# Altium PCB Custom_Keyboard.PcbDoc (part 3 of 3)
Units mil, origin at the board's own origin, x right, y up, seen from the top; angles counter-clockwise.
Board outline 3302 x 1991 mil, 2 copper layers (Top Layer, Bottom Layer), stack 57 mil thick; 188 components, 152 nets, 718 pads, 297 vias.
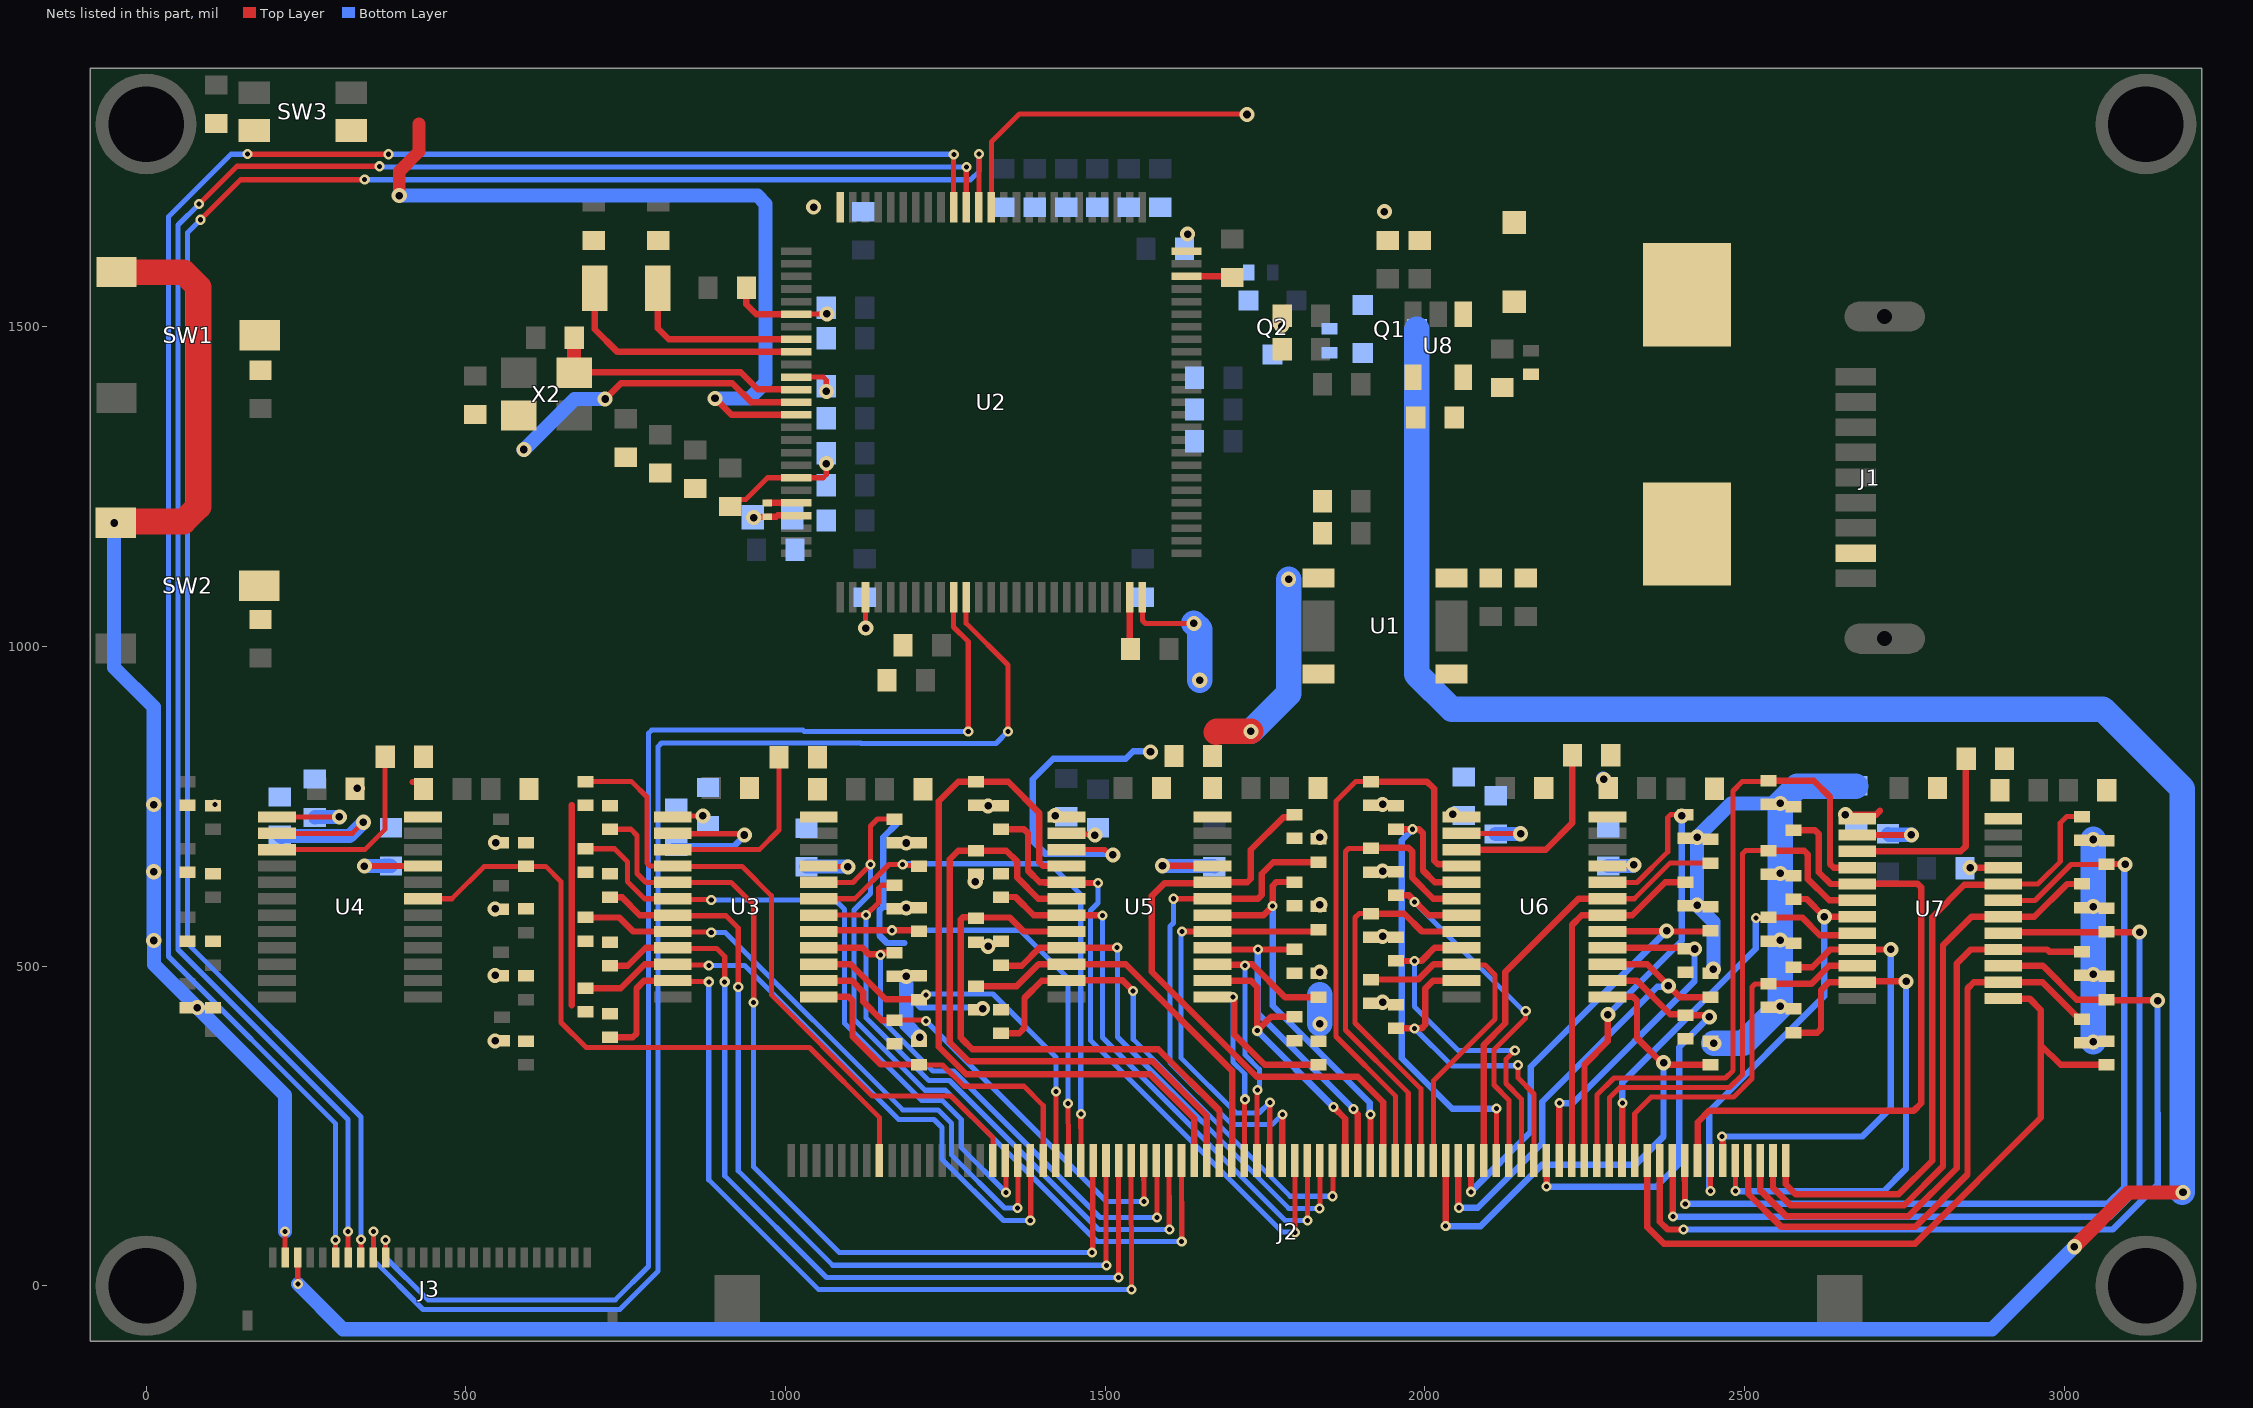
[diagram p2: the nets of this part, all layers, seen from the top]

## Via types
v1: diameter 15.75, hole 7.87, Top Layer to Bottom Layer, tented both sides, 170 vias
v2: diameter 23.62, hole 11.81, Top Layer to Bottom Layer, tented both sides, 127 vias

## Nets (pads, with @x,y where several pads share a name; then routed paths per layer and width w, separated by ;. In a path a pad name is that pad's centre, name@x,y a point inside that pad or via, vN(x,y) a via of type N, cw(c..) or ccw(c..) an arc to the next point about the centre after c; other vN are vias at no path point) (continued)
MUX_1.SDA_8: J2.8 R57.1 U4.19 | length 1049.2
  Top Layer w8: U4.19@453.17,605.3 478.3,605.3 528.5,655.5 R57.1@594,655.5 ; R57.1@594,656 625,656 649,632 649,411.94 688.44,372.5 1037.71,372.5 1147.44,262.77 J2.8@1147.44,220.44
MUX_2.SCL_9: J2.25 R60.1 U3.5 | length 1450
  Top Layer w8: R60.1@724,714 758.31,714 768,704.31 768,644.93 782.05,630.89 U3.5@816,630.89 ; U3.5@816.56,631.44 817.11,630.89 U3.5@823.83,630.89 823.94,631 915,631 950.52,595.48 950.52,443.52 v1(950.15,443.15) ; v1(1479.54,51.87) 1480.63,52.97 1480.63,194.92 J2.25@1481.72,196.01
  Bottom Layer w8: v1(950.15,443.15) 950.03,443.03 950.03,185.97 1084.13,51.87 v1(1479.54,51.87)
MUX_2.SCL_10: J2.26 R62.1 U3.7 | length 1400.4
  Top Layer w8: U3.7@824.77,578.76 907.24,578.76 926.23,559.77 v1(926.23,467.08) ; J2.26@1501.41,196.01 1501.7,195.71 1501.7,31.92 v1(1502,31.62)
  Top Layer w10: R62.1@726,607.5 744.5,607.5 772.3,579.7 U3.7@823.83,579.7
  Bottom Layer w8: v1(926.23,467.08) 926.23,179.77 1074,32 1501.62,32 v1(1502,31.62)
MUX_2.SCL_11: J2.27 R64.1 U3.9 | length 1403
  Top Layer w8: U3.9@824.95,527.76 892.24,527.76 905.08,514.92 v1(905.08,475.46) ; v1(1521,12.75) 1521.05,12.8 1521.05,195.96 J2.27@1521.09,196.01
  Top Layer w10: R64.1@726,500.5 753.5,500.5 781.52,528.52 U3.9@823.83,528.52
  Bottom Layer w8: v1(905.08,475.46) 905.08,171.92 1064.25,12.75 v1(1521,12.75)
MUX_2.SCL_12: J2.28 R66.1 U3.11 | length 1477.1
  Top Layer w8: U3.11@823.83,477.34 825.17,476 879.58,476 v1(880.13,475.46) ; J2.28@1540.78,196.01 v1(1541.14,-6.13)
  Top Layer w10: R66.1@726,388.5 761.14,388.5 767,394.36 767,465 779.34,477.34 U3.11@823.83,477.34
  Bottom Layer w8: v1(880.13,475.46) 880.13,165.87 1052.13,-6.13 v1(1541.14,-6.13)
MUX_2.SCL_13: J2.29 R68.1 U3.14 | length 724.9
  Top Layer w8: R68.1@1171,415.5 1218.5,415.5 1219.93,414.07 v1(1220.07,414.07) ; J2.29@1560.46,196.01 v1(1561,131.71)
  Top Layer w10: U3.14@1052.17,477.34 1103.62,477.34 1121.93,459.03 1121.93,444.5 1150.93,415.5 R68.1@1171,415.5
  Bottom Layer w8: v1(1220.07,414.07) 1220.07,413.93 1502.29,131.71 v1(1561,131.71)
MUX_2.SCL_14: J2.30 R70.1 U3.16 | length 873.1
  Top Layer w8: v1(1581,106.87) J2.30@1581,196.01
  Top Layer w10: U3.16@1052.17,528.52 1120.48,528.52 1130.77,518.23 1147.65,518.23 v1(1148.75,517.13) ; v1@1148.75,521 R70.1@1171,521
  Bottom Layer w8: v1(1148.75,517.13) 1148.75,417.68 1230.55,335.87 1262.88,335.87 1491.89,106.87 v1(1581,106.87)
MUX_2.SCL_15: J2.31 R72.1 U3.18 | length 1031.6
  Top Layer w8: U3.18@1052.17,579.7 v1(1126.13,579.7) 1146,599.58 1146,621.81 1150.69,626.5 R72.1@1171,626.5 ; J2.31@1599.83,196.01 1600.4,88.19 v1(1600.6,87.99)
  Bottom Layer w8: v1(1126.13,579.7) 1126.13,419.09 1224.34,320.87 1256.67,320.87 1489.55,87.99 v1(1600.6,87.99)
MUX_2.SCL_16: J2.32 R74.1 U3.20 | length 1231.6
  Top Layer w8: U3.20@1052.17,630.89 1105.67,630.89 1112.79,638 1112.86,638 1132.78,657.91 v1(1132.78,659.02) ; v1@1133.45,659.7 1133.13,660.02 1133.13,719.28 1143.84,730 R74.1@1171,730 ; J2.32@1619.52,196.01 v1(1619.88,69.12)
  Bottom Layer w8: v1(1132.78,659.02) 1133.19,658.61 1133.19,613.47 1107.25,587.52 1107.25,416.75 1218.13,305.87 1250.46,305.87 1487.21,69.12 v1(1619.88,69.12)
MUX_2.SDA_9: J2.17 R59.1 U3.4 | length 1033.6
  Top Layer w8: R59.1@684,788.5 759.5,788.5 783.69,764.32 783.69,661.06 788.37,656.38 U3.4@803.16,656.42 ; U3.4@823.83,656.48 824.3,656 932,656 978,610 978,455 1136,297 1259,297 1324.61,231.39 J2.17@1324.61,220.44
  Top Layer w10: U3.4@803.16,656.48 U3.4@823.83,656.48
MUX_2.SDA_10: J2.18 R61.1 U3.6 | length 1080.8
  Top Layer w8: R61.1@684,683.5 732.56,683.5 753,663.06 753,632 779.7,605.3 U3.6@823.83,605.3 ; U3.6@824.77,604.35 883.06,604.35 v1(884,603.41) ; J2.18@1343.93,196.01 1344.99,174.47 v1(1345,146)
  Bottom Layer w8: v1(884,603.41) 1077.59,603.41 1092.25,588.75 1092.25,410.53 1212.65,290.13 1244.99,290.13 1275.06,260.06 1275.06,215.94 v1(1345,146)
MUX_2.SDA_11: J2.19 R63.1 U3.8 | length 966.6
  Top Layer w8: U3.8@824.77,553.17 883.06,553.17 v1(884,552.23) ; v1(1363.11,121.77) 1363.98,122.63 J2.19@1363.98,196.01
  Top Layer w10: R63.1@687,576 740,576 761.89,554.11 U3.8@823.83,554.11
  Bottom Layer w8: v1(884,552.23) 906.32,552.23 1183.41,275.13 1238.77,275.13 1260.06,253.85 1260.06,204.25 1342.54,121.77 v1(1363.11,121.77)
MUX_2.SDA_12: J2.20 R65.1 U3.10 | length 999.3
  Top Layer w8: U3.10@824.77,501.99 879.18,501.99 v1(880.13,501.05) ; v1@1383.66,101.94 J2.20@1383.66,196.01
  Top Layer w10: R65.1@687,465.5 742.54,465.5 779.97,502.93 U3.10@823.83,502.93
  Bottom Layer w8: v1(880.13,501.05) 936.28,501.05 1177.2,260.13 1232.56,260.13 1245.06,247.64 1245.06,198.04 1341.15,101.94 v1(1382.94,101.94)
MUX_2.SDA_13: J2.21 R67.1 U3.13 | length 515.5
  Top Layer w8: R67.1@1209,345.43 1245.86,345.43 1279.29,312 1373,312 1403.35,281.65 J2.21@1403.35,220.44
  Top Layer w10: U3.13@1052.17,451.75 1099.07,451.75 1104.93,445.89 1104.93,390.07 1149,346 1208.43,346 R67.1@1209,345.43
MUX_2.SDA_14: J2.22 R69.1 U3.15 | length 561.1
  Top Layer w8: J2.22@1423.03,220.44 v1@1423.03,303.76
  Top Layer w10: U3.15@1052.17,502.93 1102.07,502.93 1157,448 1208.5,448 R69.1@1209,447.5
  Bottom Layer w8: v1(1220.13,455.13) 1221.2,456.2 1324.56,456.2 1423.22,357.54 v1(1423.22,303.94)
MUX_2.SDA_15: J2.23 R71.1 U3.17 | length 723.2
  Top Layer w8: v1(1442.12,285.29) J2.23@1442.72,220.44
  Top Layer w10: U3.17@1054.17,554.11 1056.06,556 v1(1167,556) 1206.73,556 1208.61,554.11 R71.1@1209,554.5
  Bottom Layer w8: v1(1167,556) 1367,556 1442.12,480.88 v1(1442.12,285.29)
MUX_2.SDA_16: J2.24 R73.1 U3.19 | length 843.9
  Top Layer w8: U3.19@1072.17,605.3 1108.27,605.3 1161.85,658.87 v1(1183.48,658.87) 1184.92,657.44 R73.1@1202.94,657.44 ; v1(1462.03,268.88) J2.24@1462.46,220.5
  Bottom Layer w8: v1(1183.48,658.87) 1184.61,660 1414,660 1462.03,611.97 1462.03,353.41 v1(1462.03,268.88)
MUX_3.SCL_17: J2.41 R76.1 U5.5 | length 1058.9
  Top Layer w8: J2.41@1796.69,196.01 1797,195.69 v1(1797,83.38)
  Top Layer w10: R76.1@1340,714 1373.14,714 1379.5,707.64 1379.5,649.43 1398.05,630.89 U5.5@1439.83,630.89 ; 1406.71,630 v1(1489,630)
  Bottom Layer w8: v1(1489,630) 1489,598.79 1477.03,586.82 1477.03,383.97 1777.13,83.87 1796.5,83.87 v1(1797,83.38)
MUX_3.SCL_18: J2.42 R78.1 U5.7 | length 895.3
  Top Layer w8: U5.7@1439.83,579.7 U5.7@1440.18,579.35 ; J2.42@1816.37,196.01 1816.37,102.72 v1(1816.84,102.25)
  Top Layer w10: R78.1@1337,607.5 1337.5,608 1360,608 1388.3,579.7 U5.7@1439.83,579.7 ; U5.7@1440.18,579.35 1494.52,579.35 1494.87,579 v1(1495.9,579)
  Bottom Layer w8: v1(1495.9,579) 1495.9,388.1 1781.75,102.25 v1(1816.84,102.25)
MUX_3.SCL_19: J2.43 R80.1 U5.9 | length 835.1
  Top Layer w8: U5.9@1439.83,528.52 U5.9@1440.06,528.76 ; J2.43@1836.06,196.01 1836.09,121.74 v1@1836.71,121.13
  Top Layer w10: R80.1@1342,500.5 1369.5,500.5 1397.52,528.52 U5.9@1439.83,528.52 ; U5.9@1440.06,528.76 v1@1517.24,528.76 ; v1@1517,529 v1@1517.24,528.76 ; v1@1519,527 v1@1517.24,528.76 ; v1@1519,528.76 v1@1517.24,528.76
  Bottom Layer w8: v1(1519,529) 1519.01,526.99 1519.43,526.57 1519.43,388.93 1787.23,121.13 v1@1836.71,121.13
  other v1: 1835.71,121.13
MUX_3.SCL_20: J2.44 R82.1 U5.11 | length 819.7
  Top Layer w8: v1@1856.2,140 J2.44@1856.2,196.01
  Top Layer w10: R82.1@1337,395 1365.57,395 1374,403.43 1374,450 1401.16,477.16 1441.42,477.16 1442.04,477.78 1527.22,477.78 v1(1544,461)
  Bottom Layer w8: v1(1544,461) 1544,385.57 1789.57,140 v1@1855,140
  other v1: 1856,140
MUX_3.SCL_21: J2.45 R84.1 U5.14 | length 449.3
  Top Layer w10: U5.14@1668.17,477.34 1727.66,477.34 1738,467 v1(1738,398.89) 1759.61,420.5 R84.1@1796,420.5 ; v1(1857.29,279.6) 1857.29,279.49 1875.69,261.09 J2.45@1875.69,220.54
  Bottom Layer w10: v1@1739.77,394.92 1738,396.69 v1(1738,398.89) v1(1857.29,279.6)
MUX_3.SCL_22: J2.46 R86.1 U5.16 | length 499.2
  Top Layer w10: U5.16@1668.17,528.52 1670.7,526 v1(1739,526) R86.1@1796,526 ; v1(1888.23,276.66) 1888.23,275.11 1895.09,268.24 1895.09,220.82 J2.46@1895.47,220.44
  Bottom Layer w10: v1(1739,526) 1739,426 1888.23,276.77 v1(1888.23,276.66)
MUX_3.SCL_23: J2.47 R88.1 U5.18 | length 585
  Top Layer w10: U5.18@1668.03,579.85 U5.18@1668.17,579.7 ; U5.18@1688.17,579.7 1747.7,579.7 v1(1762,594) 1762,625.64 1767.86,631.5 R88.1@1796,631.5 ; v1(1914.97,268) 1915.06,267.91 1915.06,220.54 J2.47@1915.16,220.44
  Bottom Layer w10: v1(1762,594) 1762,438 1913.87,286.13 1913.87,269.1 v1(1914.97,268)
MUX_3.SCL_24: J2.48 R90.1 U5.20 | length 933.9
  Top Layer w10: R90.1@1796,737 1792,733 1779,733 1728,682 1728,636.74 1722.14,630.89 U5.20@1668.17,630.89 1666.89,629.6 1592.86,629.6 1587,623.74 1573,609.74 1573,491.03 1737.03,327 1895,327 1934.84,287.16 J2.48@1934.84,220.44
MUX_3.SDA_17: J2.33 R75.1 U5.4 | length 1179.8
  Top Layer w10: R75.1@1298,788.5 1270.5,788.5 1240,758 1240,373.92 1282.92,331 1570,331 1634,267 1634.14,267 1639.57,261.58 J2.33@1639.57,220.44 ; R75.1@1300,788.5 1300.37,788.13 1348.34,788.13 1397,739.47 1397,662.33 1401.54,657.79 ; 1402.86,656.48 U5.4@1439.83,656.48
MUX_3.SDA_18: J2.34 R77.1 U5.6 | length 1015.6
  Top Layer w10: U5.6@1439.83,605.3 1395.7,605.3 1362.5,638.5 1362.5,663.5 1345.5,680.5 R77.1@1298,680.5 1270.5,680.5 1257,667 1257,380.96 1286.96,351 1574.18,351 1659.25,265.93 J2.34@1659.25,220.44
MUX_3.SDA_19: J2.35 R79.1 U5.8 | length 862.7
  Top Layer w10: R79.1@1295.71,572.21 R79.1@1298,574.5 ; R79.1@1295.71,576.21 1277.57,576.21 1274.1,572.74 1274,572.5 1274,388 1276.93,385.07 1292,370 1582.96,370 1678.94,274.02 J2.35@1678.94,220.44 ; R79.1@1303,576 1351,576 1372.89,554.11 U5.8@1439.83,554.11
MUX_3.SDA_20: J2.36 R81.1 U5.10 | length 603.1
  Top Layer w10: R81.1@1298,468.5 1361.54,468.5 1395.97,502.93 U5.10@1439.83,502.93 1532.07,502.93 1698.62,336.38 J2.36@1698.62,217.13
MUX_3.SDA_21: J2.37 R83.1 U5.13 | length 483.1
  Top Layer w8: J2.37@1717.87,220.88 1717.87,290.52 v1(1719.02,291.67)
  Top Layer w10: U5.13@1668.17,451.75 1668.33,451.6 v1@1700.25,451.6 ; v1(1700.25,451.45) v1@1700.25,451.6 ; R83.1@1834,345.43 1749.57,345.43 1701.97,393.03 1701.97,451.29 1702.13,451.45 1701.97,451.6 v1@1700.25,451.6
  Bottom Layer w8: v1(1700.25,451.45) 1700.25,349.75 1718.5,331.5 v1@1718.5,291.67
MUX_3.SDA_22: J2.38 R85.1 U5.15 | length 476.9
  Top Layer w8: J2.38@1737.9,220.54 1737.9,302.54 v1@1741.23,305.87
  Top Layer w10: U5.15@1668.17,502.93 1669.14,501.97 1718.16,501.97 v1(1719.13,501) ; v1@1719.13,502.93 1728.07,502.93 ; 1730.07,502.93 1781.5,451.5 R85.1@1834,451.5
  Bottom Layer w8: v1(1719.13,501) 1719.13,451.97 1719.13,360.87 1741.23,338.77 v1@1741.23,305.87
  other v1: 1738.23,305.87
MUX_3.SDA_23: J2.39 R87.1 U5.17 | length 683.8
  Top Layer w8: J2.39@1757.32,196.01 1757.53,196.23 1757.53,286.66 v1(1757.75,286.87)
  Top Layer w10: v1(1620.17,554) 1620.23,554.06 1668.12,554.06 U5.17@1668.17,554.11 ; U5.17@1670.17,554.11 1831.61,554.11 R87.1@1834,556.5
  Bottom Layer w8: v1(1620.17,554) 1620.17,553.17 1619,552 1619,356 1705,270 1740.88,270 v1(1757.75,286.87)
MUX_3.SDA_24: J2.40 R89.1 U5.19 | length 850.7
  Top Layer w8: v1(1606.87,605.3) U5.19@1668.17,605.3
  Top Layer w10: U5.19@1688.17,605.3 1739.14,605.3 1745,611.15 1745,644.33 1763.17,662.5 R89.1@1834,662.5 ; J2.40@1777,196.01 1777.09,196.09 1777.09,267.91 v1(1777.17,268) ; J2.40@1777.27,220.54 v1@1777.27,267.91
  Bottom Layer w8: v1(1606.87,605.3) 1606.87,567.4 1601.3,561.82 1601.3,484.94 1601.5,484.73 1601.5,349.29 1698.79,252 1761.17,252 v1(1777.17,268)
MUX_4.SCL_25: J2.57 R92.1 U6.5 | length 773.8
  Top Layer w8: J2.57@2112.01,220.44 2112.1,220.54 2112.1,276.91 v1(2112.2,277)
  Top Layer w10: R92.1@1955,714 v1(1981,714) 1990.97,714 1997.33,707.64 1997.33,649.43 2015.88,630.89 U6.5@2057.65,630.89
  Bottom Layer w10: v1(1981,714) 1964,697 1964,356 2043,277 v1(2112.2,277)
MUX_4.SCL_26: J2.58 R94.1 U6.7 | length 599.8
  Top Layer w8: J2.58@2131.69,220.44 2131.69,290.31 2108.14,313.86 2108.14,369.14 2157.45,418.45 2157.45,429.45 v1(2158,430)
  Top Layer w10: R94.1@1955,610.5 1975.33,610.5 2006.12,579.7 U6.7@2057.65,579.7
  Bottom Layer w8: v1(1984,600) 2154,430 v1(2158,430)
MUX_4.SCL_27: J2.59 R96.1 U6.9 | length 533.3
  Top Layer w8: v1@2142.81,368.12 v1(2140.81,368.12) 2140.72,368.12 2127.02,354.42 2127.02,316.2 2151.38,291.84 J2.59@2151.38,220.44
  Top Layer w10: R96.1@1955,508 v1(1984,508) 1994.83,508 2015.35,528.52 U6.9@2057.65,528.52
  Bottom Layer w8: v1(1984,508) 1984,436.55 2052.43,368.12 v1(2140.81,368.12)
MUX_4.SCL_28: J2.60 R98.1 U6.11 | length 489.2
  Top Layer w8: v1(2145.89,345.58) 2145.89,325.24 2171.06,300.06 J2.60@2171.06,220.44
  Top Layer w10: R98.1@1955,402.5 v1(1984,402.5) 1994.97,402.5 2000.83,408.36 2000.83,465 2013.17,477.34 U6.11@2057.65,477.34
  Bottom Layer w8: v1(1984,402.5) 2042.5,344 2092.36,344 2092.52,344.16 2144.47,344.16 v1(2145.89,345.58)
MUX_4.SCL_29: J2.61 R100.1 U6.14 | length 693.2
  Top Layer w10: v1(2190.74,155.02) J2.61@2190.75,196.01 ; U6.14@2286,477.34 2331.66,477.34 2384.14,424.86 2406.14,424.86 R100.1@2408,423 ; R100.1@2410,423 2443,423 v2(2445.34,420.66)
  Bottom Layer w10: v1(2190.74,155.02) 2362.02,155.02 2398,191 2398,373.33 v2(2445.34,420.66)
MUX_4.SCL_30: J2.62 R102.1 U6.16 | length 542.9
  Top Layer w10: J2.62@2210.43,220.44 v1(2210.43,285.57) ; U6.16@2286,528.52 2406.48,528.52 2408.12,526.88 2421.88,526.88 v2(2422,526.75)
  Bottom Layer w10: v1(2210.43,285.57) 2231.24,285.57 2422,476.33 v2(2422,526.75)
MUX_4.SCL_31: J2.63 R104.1 U6.18 | length 549.3
  Top Layer w10: J2.63@2230.12,220.44 2230.31,220.63 2230.31,564.36 2245.66,579.7 U6.18@2286,579.7 2324.7,579.7 2376,631 R104.1@2408,631
MUX_4.SCL_32: J2.64 R106.1 U6.20 | length 781
  Top Layer w8: U6.20@2286,630.89 2332.05,630.89 2380,678.84 2380,732.31 2384.69,737 R106.1@2402,737
  Top Layer w10: J2.64@2249.8,220.44 2249.8,345.8 2286.41,382.41 v2(2286.41,424.08) ; v2(2402,735) 2402,731.38 2402.19,731.19 R106.1@2408,737
  Bottom Layer w10: v2(2286.41,424.08) 2402,539.67 v2(2402,735)
MUX_4.SDA_25: J2.49 R91.1 U6.4 | length 906
  Top Layer w8: R91.1@1916,788.5 1891.5,788.5 1861,758 1861,390 1954.53,296.47 J2.49@1954.53,220.44
  Top Layer w10: R91.1@1916,788.5 2003.5,788.5 2014.83,777.17 2014.83,664.96 2020.68,659.11 2055.02,659.11 U6.4@2057.65,656.48
MUX_4.SDA_26: J2.50 R93.1 U6.6 | length 740.4
  Top Layer w8: R93.1@1916,684 1880.69,684 1876,679.31 1876,400 1974.21,301.79 J2.50@1974.21,220.44
  Top Layer w10: R93.1@1916,684 1917,685 1974.47,685 1980.33,679.14 1980.33,638.5 2013.53,605.3 U6.6@2057.65,605.3
MUX_4.SDA_27: J2.51 R95.1 U6.8 | length 578.9
  Top Layer w8: R95.1@1916,582 1897,582 1891,576 1891,411 1993.9,308.1 J2.51@1993.9,220.44
  Top Layer w10: R95.1@1916,582 1967.83,582 1995.71,554.11 U6.8@2057.65,554.11
MUX_4.SDA_28: J2.52 R97.1 U6.10 | length 516.4
  Top Layer w8: J2.52@2013.58,220.44 2013.58,320.58 2110,417 2110,486 2094.49,501.51 2059.08,501.51 U6.10@2057.65,502.93
  Top Layer w10: R97.1@1916,479 1989.87,479 2013.8,502.93 U6.10@2057.65,502.93
MUX_4.SDA_29: J2.53 R99.1 U6.13 | length 855.1
  Top Layer w10: J2.53@2032.91,196.01 2033,195.91 2033,94.18 v1@2033.81,93.37 ; U6.13@2286,451.75 2326.14,451.75 2332,445.89 2332,387.43 2370.62,348.81 v2(2373.48,348.81) ; v2@2374,345.43 R99.1@2447,345.43
  Bottom Layer w10: v1@2032.81,92.73 v1(2032.81,93.37) 2087.37,93.37 2183,189 2329,189 2373.48,233.48 v2(2373.48,348.81)
MUX_4.SDA_30: J2.54 R101.1 U6.15 | length 763.5
  Top Layer w10: v1@2052.59,122 J2.54@2052.59,196.01 ; U6.15@2286,502.93 2345.89,502.93 ; 2347.89,502.93 2399.33,451.5 R101.1@2447,451.5
  Bottom Layer w10: v1(2053.69,122) 2083.04,122 2183.76,222.72 2183.76,287.76 2363.67,467.67 2379.67,467.67 v2(2381,469)
MUX_4.SDA_31: J2.55 R103.1 U6.17 | length 729.1
  Top Layer w10: J2.55@2072,181.36 2072.37,180.99 2072.37,147.09 v1(2072.46,147) ; U6.17@2288,554.11 2288.44,554.56 2377.75,554.56 v2(2378.19,555) ; v2@2378.19,554.11 2412.71,554.11 2445.61,554.11 R103.1@2447,555.5
  Bottom Layer w10: v1(2072.46,147) 2072.46,147.46 2165.76,240.76 2165.76,342.57 v2(2378.19,555)
MUX_4.SDA_32: J2.56 R105.1 U6.19 | length 676.3
  Top Layer w8: U6.19@2286,605.3 2327.67,605.3 2383.37,661 R105.1@2447,661
  Top Layer w10: J2.56@2091.96,220.08 2092,220.12 2092,376.37 2126,410.37 2126,490.75 2240.54,605.3 U6.19@2286,605.3
MUX_5.SCL_33: J2.73 R108.1 U7.5 | length 1007
  Top Layer w10: J2.73@2426.97,220.44 2426.97,255.97 2445,274 2765.14,274 2776.62,285.48 2776.62,623 2770.76,628.86 2677.19,628.86 U7.5@2676.65,628.32 2634.88,628.32 2616.33,646.87 2616.33,706.58 2610.47,712.43 R108.1@2577,712.43
MUX_5.SCL_34: J2.74 R120.1 U7.7 | length 707.2
  Top Layer w8: v1@2446.29,148.58 v1(2447,147.87) J2.74@2446.29,196.01
  Top Layer w10: R120.1@2576.83,604.93 2597.33,604.93 v2(2625.12,577.14) ; U7.7@2666.95,577.14 v2(2625.12,577.14) ; U7.7@2676.94,576.85 U7.7@2676.65,577.14 v2(2625.12,577.14)
  Bottom Layer w10: v1(2447,147.87) 2445.2,149.68 2445.2,273.2 2625.12,453.12 v2(2625.12,577.14)
MUX_5.SCL_35: J2.75 R122.1 U7.9 | length 729.9
  Top Layer w10: v1(2465.07,233.52) 2465.89,232.7 2465.89,196.09 J2.75@2465.98,196.01 ; R122.1@2578.83,497.93 2606.33,497.93 2634.35,525.96 U7.9@2676.65,525.96 ; U7.9@2676.94,525.67 2677.27,526 v2(2729,526)
  Bottom Layer w10: v1(2465.07,233.52) 2684.52,233.52 2729,278 v2(2729,526)
MUX_5.SCL_36: J2.76 R124.1 U7.11 | length 857.3
  Top Layer w8: v1@2486.02,148.22 J2.76@2486.02,187
  Top Layer w10: R124.1@2577,395.93 2613.97,395.93 2619.83,401.79 2619.83,462.43 2632.17,474.78 U7.11@2676.65,474.78 ; U7.11@2676.94,474.49 2678.45,476 v2(2752.81,476)
  Bottom Layer w10: v1(2486.2,148.05) 2718.05,148.05 2752.81,182.81 v2(2752.81,476)
MUX_5.SCL_37: J2.77 R126.1 U7.14 | length 948.3
  Top Layer w10: J2.77@2505.71,196.01 2506.07,195.65 2506.07,143.93 2558,92 2767,92 2849,174 2849,465 2858.78,474.78 U7.14@2905,474.78 2966.31,474.78 3024.15,416.93 R126.1@3027.65,416.93
MUX_5.SCL_38: J2.78 R128.1 U7.16 | length 927.8
  Top Layer w10: J2.78@2525.03,196.01 2525.03,149.01 2565.04,109 2757,109 2832,184 2832,504 2853.96,525.96 U7.16@2905,525.96 2973.3,525.96 2976.83,522.43 R128.1@3027.65,522.43
MUX_5.SCL_39: J2.79 R130.1 U7.18 | length 927.7
  Top Layer w10: J2.79@2544.72,196.01 2544.72,153.37 2572.08,126 2749.96,126 2810.62,186.66 2810.62,532.62 2855.14,577.14 U7.18@2905,577.14 ; U7.18@2925,577.14 2953.39,577.14 3004.68,628.43 R130.1@3027.65,628.43
MUX_5.SCL_40: J2.80 R132.1 U7.20 | length 1010.5
  Top Layer w8: U7.20@2905,628.32 2958.97,628.32 2964.83,634.18 2994,663.35 2994,723.79 3004.15,733.93 R132.1@3027.65,733.93
  Top Layer w10: J2.80@2564.4,196.01 2564.4,158.6 2580,143 2741,143 2793.62,195.62 2793.62,576.62 2844,627 2903.68,627 U7.20@2905,628.32
MUX_5.SDA_33: J2.65 R107.1 U7.4 | length 1061
  Top Layer w8: J2.65@2269.49,220.44 2269.49,298.64 2295.85,325 2470.57,325 2482,336.43 2482,774 2496.61,788.61 R107.1@2536.68,788.61
  Top Layer w10: R107.1@2536.68,788.61 2538.07,790 2608.26,790 2633.83,764.43 2633.83,659.77 2638.37,655.22 ; 2639.68,653.91 U7.4@2676.65,653.91
MUX_5.SDA_34: J2.66 R109.1 U7.6 | length 878.5
  Top Layer w8: J2.66@2289.13,220.49 2289.13,294.23 2304.89,310 2476.79,310 2497,330.21 2497,675.81 2501.69,680.5 R109.1@2538,680.5
  Top Layer w10: R109.1@2538,680.5 2538.25,680.25 2593.47,680.25 2599.33,674.39 2599.33,635.93 2632.53,602.73 U7.6@2676.65,602.73
MUX_5.SDA_35: J2.67 R121.1 U7.8 | length 612.7
  Top Layer w10: J2.67@2308.99,220.57 v1(2309,286) ; v1(2517.87,575) R121.1@2538,576 2590.26,576 2618.07,548.19 2673.3,548.19 U7.8@2676.65,551.55
  Bottom Layer w10: v1(2309,286) 2309,318 2517.87,526.87 v1(2517.87,575)
MUX_5.SDA_36: J2.68 R123.1 U7.10 | length 576.6
  Top Layer w8: J2.68@2328.54,220.44 2328.54,269.54 2354,295 2483,295 2512,324 2512,467.46 2516.69,472.15 R123.1@2536.71,472.15
  Top Layer w10: R123.1@2537.21,471.65 R123.1@2538,472.43 2604.87,472.43 2632.8,500.37 U7.10@2676.65,500.37
MUX_5.SDA_37: J2.69 R125.1 U7.13 | length 1162.5
  Top Layer w10: J2.69@2347.87,196.01 2348.23,195.65 2348.23,91.77 2374,66 2767,66 2963.61,262.61 2963.61,376.39 ; U7.13@2905,449.19 2945.82,449.19 2963.61,431.39 2963.61,376.39 ; R125.1@3066.65,345.43 2994.57,345.43 2963.61,376.39
MUX_5.SDA_38: J2.70 R127.1 U7.15 | length 1457.6
  Top Layer w10: J2.70@2367.55,196.01 2367.72,195.83 2367.72,100.17 2379.89,88 v1(2405,88) ; U7.15@2905,500.37 2964.89,500.37 ; 2966.89,500.37 3019.83,447.43 R127.1@3066.65,447.43 ; R127.1@3066.94,447.15 3067.37,446.72 3145.47,446.72 v2(3146.19,446)
  Bottom Layer w10: v1(2405,88) 3076,88 3146.19,158.19 3146.19,269.87 v2(3146.19,446)
MUX_5.SDA_39: J2.71 R129.1 U7.17 | length 1451.6
  Top Layer w10: J2.71@2387.24,196.01 2387.6,195.65 2387.6,108.4 v1(2388,108) ; U7.17@2905,551.55 2906.45,553 3066.22,553 R129.1@3066.65,553.43 3068.09,552 3069.09,553 R129.1@3070.09,552 ; R129.1@3070.09,553 v2(3118,553)
  Bottom Layer w10: v1(2388,108) 3071.96,108 3118,154.04 v2(3118,553)
MUX_5.SDA_40: J2.72 R131.1 U7.19 | length 1463.7
  Top Layer w8: U7.19@2925,602.73 2954.59,602.73 2981.83,629.96 3010.8,658.93 R131.1@3066.65,658.93
  Top Layer w10: J2.72@2406.92,196.01 v1@2407,128.75 ; R131.1@3067.37,659.65 v2@3094.96,659.65
  Bottom Layer w10: v1(2407.47,128) 3067.92,128 3094.19,154.27 3094.19,658.88 v2@3095.38,660.07
  other v2: 3095.38,659.07
NetC14_1: C14.1 U2.49 | length 81.3
  Top Layer w10: U2.49@1538.65,1076.76 1538.65,997.35 C14.1@1540,996
NetC15_1: C15.1 U2.73 | length 72.5
  Top Layer w10: U2.73@1627.23,1578.73 1697.27,1578.73 C15.1@1699,1577
NetQ1_1: Q1.1 Q2.3 R4.2
NetR2_2: R2.2 SW1.2
NetR3_2: R3.2 SW2.2
NetR10_1: R10.1 U3.1 | length 47.9
  Top Layer w8: U3.1@823.83,733.25 825.58,735 v2(871,735)
NetR12_1: R12.1 U3.2 | length 233.8
  Top Layer w8: U3.2@823.83,707.66 824.56,706.92 933.89,706.92 v2(935.81,705)
  Bottom Layer w10: R12.1@823,687.5 919.47,687.5 935.81,703.84 v2(935.81,705)
NetR13_2: R13.2 U3.3 | length 292.5
  Top Layer w8: U3.3@823.83,682.07 959.07,682.07 990,713 R13.2@990,826.5
NetR14_1: R14.1 U4.1 | length 136.3
  Top Layer w8: U4.1@204.83,733.25 204.89,733.31 302.31,733.31 v2(302.38,733.37)
  Bottom Layer w22: R14.1@264,732.5 264.56,733.06 302.07,733.06 v2(302.38,733.37)
NetR15_1: R15.1 U3.21 | length 111.1
  Top Layer w8: U3.21@1052.17,656.48 1052.91,655.74 1097.26,655.74 v2(1097.82,655.21)
  Bottom Layer w22: R15.1@1033,655.5 1097.5,655.5 v2(1097.82,655.21)
NetR16_1: R16.1 U4.2 | length 283.9
  Top Layer w8: U4.2@204.83,707.66 322.66,707.66 v2(340,725)
  Bottom Layer w22: R16.1@209,704.5 211.5,702 213,703.5 318.5,703.5 v2(340,725)
NetR17_2: R17.2 U4.3 | length 295.9
  Top Layer w8: U4.3@204.83,682.07 342.07,682.07 374,714 R17.2@374,827.5
NetR18_1: R18.1 U4.21 | length 139.6
  Top Layer w10: v2(341.52,656.48) U4.21@433.17,656.48
  Bottom Layer w22: v2(341.52,656.48) R18.1@383,656.5 ; R18.1@373.51,657.5 R18.1@380,657.5
NetR21_1: R21.1 U5.1 | length 19.5
  Top Layer w8: U5.1@1421.75,734.75 v2(1421.75,735.33) 1423.83,733.25 U5.1@1439.83,733.25
NetR22_1: R22.1 U5.2 | length 45.3
  Top Layer w8: U5.2@1439.83,707.66 1441.22,706.27 1482.58,706.27 v2(1483.97,704.88)
NetR23_2: R23.2 U5.3 | length 509.3
  Top Layer w8: U5.3@1439.83,682.07 1499.81,682.07 1507.96,673.92 v2(1512.19,673.92)
  Bottom Layer w10: v2(1512.19,673.92) 1510.11,676 1406.03,676 1387,695.03 1387,791.97 1419.16,824.13 1532.13,824.13 1544,836 1570,836 v2(1571,835)
NetR24_1: R24.1 U5.21 | length 160.4
  Top Layer w10: v2(1589.81,657) 1590.07,656.74 1667.91,656.74 U5.21@1668.17,656.48
  Bottom Layer w22: v2(1589.81,657) 1590.12,656.69 1669.81,656.69 R24.1@1671,655.5
NetR29_1: R29.1 U6.1
  other v2: 2043.75,737.33
NetR30_1: R30.1 U7.1 | length 56.5
  Top Layer w10: v2(2658,737) 2706,737 2712,743
NetR31_1: R31.1 U6.2 | length 131.8
  Top Layer w8: U6.2@2057.65,707.66 2057.98,707.33 2149.67,707.33 v2(2150,707)
  Bottom Layer w22: R31.1@2111,706.5 2111.25,706.75 2149.75,706.75 v2(2150,707)
NetR32_2: R32.2 U6.3 | length 296.7
  Top Layer w10: U6.3@2057.65,682.07 2189.07,682.07 2231,724 R32.2@2231,830
NetR33_1: R33.1 U7.2 | length 121.8
  Top Layer w10: U7.2@2676.65,705.09 v2(2761.19,705.09)
  Bottom Layer w22: R33.1@2724.65,706.93 2726.19,705.4 2760.88,705.4 v2(2761.19,705.09)
NetR34_2: R34.2 U7.3 | length 312.5
  Top Layer w10: U7.3@2676.65,679.5 2838.5,679.5 2846,687 R34.2@2846,827
NetR35_1: R35.1 U6.21 | length 82.8
  Top Layer w8: U6.21@2286,656.48 2286.89,657.37 2326.27,657.37 v2(2327.16,658.26)
  Bottom Layer w22: R35.1@2287,656.5 2293.17,656.5 2293.5,656.83 2325.29,656.83 2326.72,658.26 v2(2327.16,658.26)
NetR36_1: R36.1 U7.21 | length 51.9
  Top Layer w10: v2(2853.09,653.91) U7.21@2905,653.91
NRST: C18.1 SW3.1 U2.14 | length 1209.6
  Top Layer w10: v2(889.84,1388) 915.65,1362.2 U2.14@1016.99,1362.2
  Top Layer w20: v2(396,1705) 396,1743 427,1774 427,1817
  Bottom Layer w22: v2(396,1705) 956.11,1705 969,1692.11 969,1413 944,1388 v2(889.84,1388)
OLED_IO: Q2.1 R5.2 U2.88 | length 520.1
  Top Layer w8: U2.88@1322.11,1687 1322.11,1788.8 1365.93,1832.62 1721.38,1832.62 v2(1722,1832)
ROW_1: J3.17 U2.35 | length 2070.8
  Top Layer w8: J3.17@374.69,44.43 v1(374.69,71.57) ; U2.35@1263.06,1076.76 1263.06,1030.54 1286,1007.6 v1(1286,867.13)
  Bottom Layer w8: v1(374.69,71.57) 374.69,44.31 441,-22 734,-22 786,30 786,864.21 790.79,869 1027.41,869 1029.28,867.13 v1(1286,867.13)
ROW_2: J3.18 U2.36 | length 2185.2
  Top Layer w8: v1(355.43,85.07) J3.18@355.43,44 J3.18@357,42.43 ; U2.36@1282.74,1056.76 1282.74,1036.26 1348.27,970.73 v1(1348.27,867.13)
  Bottom Layer w8: v1(355.43,85.07) 355.43,40.57 433,-37 741,-37 801,23 801,843.57 806.31,848.87 1117.82,848.87 1118.44,848.25 1329.4,848.25 v1(1348.27,867.13)
ROW_3: J3.19 U2.89 | length 3103.7
  Top Layer w8: v1(85.09,1667.35) 147.75,1730 v1(342,1730) ; J3.19@335.74,44 335.33,44.41 336,45.07 v1(336,72.22) ; U2.89@1302.43,1687 1302.71,1687.29 1302.71,1769.71 v1(1303,1770)
  Bottom Layer w8: v1(85.09,1667.35) 65,1647.25 65,535 336,264 v1(336,72.22) ; v1(342,1730) 1289.69,1730 1303,1743.31 v1(1303,1770)
ROW_4: J3.20 U2.90 | length 3059.8
  Top Layer w8: v1(83,1691.95) 142.05,1751 v1(365,1751) ; J3.20@316.05,44 v1(316.05,85.07) ; U2.90@1282.74,1687 1282.87,1687.13 1282.87,1749.87 v1(1283,1750)
  Bottom Layer w8: v1(83,1691.95) 50,1658.95 50,526 316,260 v1@316,85.07 ; v1(365,1751) 365.87,1750.13 1282.87,1750.13 v1(1283,1750)
ROW_5: J3.21 U2.91 | length 3088
  Top Layer w8: v1(158.87,1769.87) 379.07,1769.87 v1(379.13,1769.81) ; v1(296.18,71.33) 296.18,44.18 J3.21@296.37,44 ; U2.91@1263.06,1687 1263.06,1769.43 v1(1263.34,1769.71)
  Bottom Layer w8: v1(158.87,1769.87) 132.87,1769.87 35,1672 35,515 296,254 v1@296,71.33 ; v1(379.13,1769.81) 379.18,1769.76 1263.29,1769.76 v1(1263.34,1769.71)
SHD: R133.1 U8.4
SW: D1.1 L2.2 U8.1
VCC_3V3: C3.1 C4.1 C5.1 C6.1 C7.1 C8.1 C9.1 C10.1 C11.1 C12.1 C13.1 C21.1 C22.1 C23.1 C24.1 C25.1 C29.1 C32.1 C33.1 J3.25 L1.1 R6.2 R7.1 R8.1 R9.1 R10.2 R11.1 R12.2 R13.1 R14.2 R15.2 R16.2 R17.1 R18.2 R19.1 R20.1 R23.1 R25.1 R26.1 R27.1 R28.1 R29.2 R30.2 R31.2 R32.1 R34.1 R35.2 R37.2 R38.2 R39.2 R40.2 R41.2 R42.2 R43.2 R44.2 R45.2 R46.2 R47.2 R48.2 R49.2 R50.2 R51.2 R52.2 R53.2 R54.2 R55.2 R56.2 R57.2 R58.2 R59.2 R60.2 R61.2 R62.2 R63.2 R64.2 R65.2 R66.2 R67.2 R68.2 R69.2 R70.2 R71.2 R72.2 R73.2 R74.2 R75.2 R76.2 R77.2 R78.2 R79.2 R80.2 R81.2 R82.2 R83.2 R84.2 R85.2 R86.2 R87.2 R88.2 R89.2 R90.2 R91.2 R92.2 R93.2 R94.2 R95.2 R96.2 R97.2 R98.2 R99.2 R100.2 R101.2 R102.2 R103.2 R104.2 R105.2 R106.2 R107.2 R108.2 R109.2 R110.2 R111.2 R112.2 R113.2 R114.2 R115.2 R116.2 R117.2 R118.2 R120.2 R121.2 R122.2 R123.2 R124.2 R125.2 R126.2 R127.2 R128.2 R129.2 R130.2 R131.2 R132.2 SW1.1 SW2.1 U1.1 U2.6 U2.11 U2.19 U2.28 U2.50 U2.75 U2.100 U3.24 U4.24 U5.24 U6.24 U7.24 | length 5016.8
  Top Layer w8: R44.2@105,751 106,751 v1(108,753) ; v1(217.31,84.76) 217.31,43.69 J3.25@217.63,44 ; R113.2@914,1219 925,1230 938.33,1230 953,1244.67 972.1,1263.77 U2.19@1016.99,1263.77 1059.18,1263.77 1063.87,1268.46 1063.87,1285.87 v2(1064,1286) ; U2.11@1016.99,1421.25 1059.18,1421.25 1063.87,1416.57 1063.87,1399.16 v2(1064,1399.02) ; U2.6@1016.99,1519.68 1064.68,1519.68 v2(1065,1520) ; v2@1125.26,1029.08 U2.28@1125.26,1076.76 ; U2.50@1558.33,1076.76 1558.33,1040.69 1563.02,1036 v2(1639,1036)
  Top Layer w10: 417,788 424,788 434,778 R9.1@434,777 ; 666,439 666,752 ; R65.2@686.5,429 R65.2@687,428.5 ; C29.1@939,1561 939,1535 954.32,1519.68 U2.6@1016.99,1519.68
  Top Layer w40: SW2.1@-46.41,1195.43 58.57,1195.43 82,1218.86 82,1561.99 58.57,1585.43 SW1.1@-46.41,1585.43 ; 1674,866 1675,867 v2(1728,867)
  Bottom Layer w10: 1174.5,723 1153,701.5 1153,593 ; 1186.13,536.13 1158.77,536.13 1147.13,547.77 1147.13,587.13 1153,593 ; 1189,458.15 1211.89,435.25 1306.62,435.25 v2(1308.49,433.39) ; 1189,471.07 v2(1189,484) ; v2(1189,591) 1187,593 1153,593
  Bottom Layer w22: v2(-50,1193) -50,967 12,905 v2(12,752.5) v2(12,647.5) v2(12,540) 12.31,539.69 12.31,502.69 v2(80,435) 217,298 v1@217,84.76 ; 1189,471.07 1189,458.15 1189,408.54 1208.42,389.12 1209.57,389.12 v2(1209.88,388.81) ; v2@2279,793 v2(2280,792) ; v2(2451.19,495) 2451.5,495.31 2451.5,515.34 2451.81,515.65 2451.81,569.25 2426,595.06 v2(2426,595.5) v2(2426,701.5) 2478.93,754.43 v2(2556,754.43)
  Bottom Layer w40: v2(1639,1036) 1648,1027 v2(1648,947) ; v2(1728,867) 1787,926 v2(1787,1105) ; v2(1836,409.48) 1836,455 ; v2(2452,379) 2498.07,379 v2(2556,436.93) v2(2556,540.5) v2(2556,645) v2(2556,754.43) 2582.57,781 R30.2@2673.72,781 ; v2(3045.65,381.43) v2(3045.65,486.93) v2(3045.65,592.93) v2(3045.65,698)
  other v2: 546,383 1934,443.5 546,485.57 1836,490.5 1317,531 1934,546.5 546,589.57 1836,596 1297,632 1934,648.5 546.81,693.07 1189,692.5 1836,701.5 1317,750.5 1934,753 330.44,778.08 1125.58,1028.76 1629,1645 1044,1687
VCC_5V: C1.1 C2.1 C26.1 C30.1 J1.1 L2.1 R133.2 U1.3 U1.4 U1.6 U8.5
VCC_7V5: C27.1 C28.2 C31.1 D1.2 Q1.2 R4.1 RF1.1
  other v2: 1776,1501 1937,1680
VDD: J3.24 Q1.3 | length 5550.7
  Top Layer w8: v1(237.31,2.93) J3.24@237.31,44
  Top Layer w22: v2(3016,61) 3101,146 v2(3186,146)
  Bottom Layer w22: v1(237.31,2.93) 308.24,-68 2887,-68 v2(3016,61)
  Bottom Layer w40: Q1.3@1987.65,1496.4 1987.65,956.35 2042,902 3060.47,902 3185,777.47 v2@3185,146
VDDA: L1.2 R1.2 U2.22 | length 68
  Top Layer w10: v2(950.55,1201.43) 951.55,1202.43 971.08,1202.43 R1.2@971.39,1202.75 985.75,1202.75 988,1205 1016.71,1205 U2.22@1016.99,1204.72
VREF: R1.1 U2.21 | length 45.6
  Top Layer w10: R1.1@971.39,1224.4 U2.21@1016.99,1224.4
XH_IN: C19.2 U2.12 X2.1 | length 414
  Top Layer w10: X2.1@669.61,1427.93 670.5,1428.81 930.19,1428.81 956.53,1402.47 1016.09,1402.47 U2.12@1016.99,1401.57
  Top Layer w22: X2.1@669.61,1427.93 C19.2@669.61,1482.93
XH_OUT: C20.2 U2.13 X2.3 | length 485.1
  Top Layer w10: v2(718,1387) 742.81,1411.81 916.92,1411.81 946.85,1381.88 U2.13@1016.99,1381.88
  Top Layer w22: X2.3@580.82,1363.18 X2.3@583,1361
  Bottom Layer w22: v2@590.69,1307.25 670.44,1387 v2(718,1387)
  other v2: 591,1308
XL_IN: C16.2 U2.8 X1.1 | length 315.9
  Top Layer w10: X1.1@800,1588.5 800.21,1588.29 800.21,1497.79 817.69,1480.31 U2.8@1016.99,1480.31 ; X1.1@800.21,1587.71 X1.1@801,1588.5
XL_OUT: C17.2 U2.9 X1.2 | length 425.9
  Top Layer w10: X1.2@699.29,1588.5 701.79,1586 X1.2@701.79,1558 ; X1.2@700.57,1558 X1.2@701,1557.57 ; X1.2@701.79,1560 701.79,1496.21 737.38,1460.62 U2.9@1016.99,1460.62
pads on no net: J1.5 J1.7 J1.8 J1.9 J3.22 J3.23 U2.1 U2.2 U2.3 U2.4 U2.5 U2.7 U2.15 U2.23 U2.26 U2.29 U2.30 U2.31 U2.32 U2.38 U2.39 U2.40 U2.41 U2.42 U2.43 U2.44 U2.45 U2.46 U2.51 U2.52 U2.53 U2.54 U2.55 U2.56 U2.57 U2.58 U2.59 U2.60 U2.61 U2.62 U2.68 U2.69 U2.72 U2.76 U2.77 U2.78 U2.79 U2.80 U2.86 U2.95 U2.96 U2.97 U2.98

## Polygon pours and split planes (outlines as drawn)
GND on Bottom Layer "Polygon_2" (hatched 45Degree grid 20 track 15, remove dead copper, pour order 1): 11,11 18,11 3114,15 3114,1806 3113,1805 11,1805
GND on Top Layer "Polygon_1" (hatched 45Degree grid 20 track 15, remove dead copper, pour order 0): 11,11 18,11 3114,15 3114,1806 3113,1805 11,1805

## Other copper
Top Layer:
  rectangle net VCC_5V: 2017,1235 2183,1441
  rectangle net VCC_3V3: 1823,371 1849,423
  rectangle net VCC_3V3: 1105,891 1197,1042
  rectangle net MUX_2.SCL_14: 1139.21,507 1187,531
  rectangle net MUX_1.SDA_1: 999,169 1015,222
  rectangle net GND: 2727,747 2758,797
  rectangle net GND: 2606,-81 3207,42
  rectangle net GND: 1410,388 1515,461
  rectangle net GND: 2024,420.59 2090,461
  rectangle net GND: 718,-52 962,46
  rectangle net GND: -82,-82 202,60
  rectangle net GND: 169,-81 2977,-33
  rectangle net GND: 83,347 245,382
  rectangle net GND: 174,347 245,461
  rectangle net GND: 2646,393 2708,458
  rectangle net GND: 1920,1557 2016,1603
  rectangle net GND: 794,406 861,461
  rectangle net GND: 2943,-74 2977,176
  rectangle net MUX_3.SDA_21: 1638,443 1715,461
  rectangle net NetR29_1: 2027.83,724 2087.83,796
  rectangle net GND: -81,1851 3207,1896
  rectangle net VCC_3V3: 729,1189 931,1239
  rectangle net VCC_3V3: 729,1216 887,1263
  rectangle net VCC_3V3: 729,1238 822,1309
  rectangle net GND: 444,1678 895,1740
  rectangle net GND: -81,824 249,957
  rectangle net GND: -81,951 18,1030
  rectangle net GND: 235,756 290,957
  rectangle net VCC_3V3: 1668,806 1848,832
  rectangle net MUX_3.SCL_21: 1776,407 1812,435
  rectangle net MUX_2.SDA_14: 1194,437 1227,463
  rectangle net VCC_3V3: 584,738.5 742,763.5
  rectangle net VCC_3V3: 661,415.5 742,440.5
  rectangle net VCC_3V3: 661,526 742,551
  rectangle net VCC_3V3: 535,368.5 607,396.5
  rectangle net GND: 2641,1325 2733,1397
  rectangle net VCC_7V5: 1920,1615 2180,1699
  rectangle net VCC_5V: 2443,1131 2715,1160
  rectangle net VCC_7V5: 1761,1447 1798,1541
  rectangle net VCC_3V3: 1603,1612 1651,1657
  rectangle net VCC_3V3: 995,1662 1092,1711
  rectangle net GND: 444,1402 624,1687
  rectangle net GND: 859,1543 895,1714
  rectangle net XH_OUT: 492,1293 612,1385
  rectangle net VCC_3V3: 2435,687.5 2469,879
  rectangle net VCC_3V3: 2168,858.5 3082,898.5
  rectangle net VCC_3V3: 3051,705 3082,898.5
  rectangle net VCC_3V3: 2784,747 2825,890
  rectangle net VCC_3V3: 2874.83,721.43 2935,895.43
  rectangle net I2C3_SCL: 2372,755 2419,801
  rectangle net VCC_3V3: 2255.83,724 2318.83,898
  rectangle net VCC_3V3: 2162,755.5 2203,898.5
  rectangle net NetR30_1: 2647,722 2719,756
  rectangle net VCC_3V3: 2525,422.93 2590.35,450.93
  rectangle net VCC_3V3: 2525,526.5 2590.35,554.5
  rectangle net VCC_3V3: 2525,631 2587,659
  rectangle net VCC_3V3: 2525,740.43 2590.35,768.43
  rectangle net VCC_3V3: 3014.65,367.43 3080,395.43
  rectangle net VCC_3V3: 3014.65,472.93 3080,500.93
  rectangle net VCC_3V3: 3014.65,578.93 3080,606.93
  rectangle net VCC_3V3: 3014.65,684.43 3082,712.43
  rectangle net GND: 1569,948 1621,1016
  rectangle net GND: 1516,899 1621,954
  rectangle net GND: 1516,761 1543,954
  rectangle net NetR23_2: 1555,811 1623,851
  rectangle net VCC_3V3: 1817,687.5 1848,832
  rectangle net MUX_3.SCL_24: 1783,723 1809,747
  rectangle net NetR21_1: 1410,724 1470,796
  rectangle net VCC_3V3: 2390,364 2459,399.43
  rectangle net VCC_3V3: 2398,478 2463,504
  rectangle net VCC_3V3: 2395,581.5 2459,609.5
  rectangle net VCC_3V3: 2395,687.5 2459,715.5
  rectangle net VCC_3V3: 1903,429.5 1967,457.5
  rectangle net VCC_3V3: 1903,532.5 1967,560.5
  rectangle net VCC_3V3: 1903,634.5 1967,662.5
  rectangle net VCC_3V3: 1903,739 1967,767
  rectangle net VCC_3V3: 1783,371 1847,399
  rectangle net VCC_3V3: 1783,476.5 1847,504.5
  rectangle net VCC_3V3: 1783,582 1847,610
  rectangle net VCC_3V3: 1783,687.5 1847,715.5
  rectangle net VCC_3V3: 1633,724 1698,974
  rectangle net VCC_3V3: 1571,761 1683,799
  rectangle net VCC_3V3: 1197,678.5 1228,898
  rectangle net VCC_3V3: 926,858 1228,899
  rectangle net VCC_3V3: 1022,724 1085,898
  rectangle net VCC_3V3: 926,755 967,898
  rectangle net VCC_3V3: 1278,736.5 1355,764.5
  rectangle net VCC_3V3: 1278,601 1315,632
  rectangle net VCC_3V3: 1278,624 1350,658
  rectangle net VCC_3V3: 1286,519 1351,552
  rectangle net VCC_3V3: 1286,417.5 1355,445.5
  rectangle net VCC_3V3: 1150,367.93 1227,399
  rectangle net VCC_3V3: 1154,470 1227,498
  rectangle net VCC_3V3: 1158,577 1227,605
  rectangle net VCC_3V3: 1150,678.5 1227,706.5
  rectangle net VCC_3V3: 535,471 612,499
  rectangle net VCC_3V3: 535,575 612,603
  rectangle net VCC_3V3: 309,859 940,899
  rectangle net VCC_3V3: 309,756 350,899
  rectangle net VCC_3V3: -4,737.5 121,765.5
  rectangle net VCC_3V3: -4,632.5 117,660.5
  rectangle net VCC_3V3: -1,525 121,553
  rectangle net VCC_3V3: 52,421 121,449
  rectangle net NRST: 91,1786 437,1834
  rectangle net VCC_3V3: 661,633.5 742,658.5
  rectangle net VCC_3V3: 584,680 620,899
  rectangle net VCC_3V3: 541,680 620,705
  rectangle net VCC_3V3: 403,724 466,899
  rectangle net NetR3_2: 142,1024 216,1125
  rectangle net NetR2_2: 142,1414 216,1515
  rectangle net VCC_5V: 2407,976 2478,1116
  rectangle net VCC_5V: 1804,930 2478,983
  rectangle net VCC_3V3: 1764,1088 1863,1251
  rectangle net GND: 1803,992 2196,1074
  rectangle net SHD: 1964,1336 2002,1441
  rectangle net GND: 1884,992 1928,1451
  rectangle net VCC_5V: 2017,1086 2478,1258
  rectangle net GND: 1884,1448 2183,1482
  rectangle net SW: 2045,1496 2475,1603
  rectangle net GND: 2007,1466 2038,1603
  rectangle net FB: 1820,1391 1863,1506
  rectangle net FB: 1820,1495 1996,1541
  rectangle net XL_IN: 780,1525 820,1652
  rectangle net XL_OUT: 681,1525 722,1652
  pour cut-out: 2189,1086 2617,1086 2617,1637 2189,1637
Bottom Layer:
  rectangle net VCC_3V3: 362,701 401,759
  rectangle net VCC_3V3: 2672,761 2700,801
  rectangle net GND: 2646,1544 3207,1898
  rectangle net COl_16: 1685,1400.5 1727,1439
  rectangle net COl_15: 1685,1353 1725,1391.5
  rectangle net COl_14: 1685,1298 1725,1342
  rectangle net VCC_3V3: 91,730 231,765
  rectangle net VCC_3V3: 534,369 559,708
  rectangle net VCC_3V3: 91,755 401,817
  rectangle net VCC_3V3: 1816,431 1949,811
  rectangle net VCC_3V3: 2260,699 2310,763
  rectangle net VCC_3V3: 1818,758 2310,811
  rectangle net GND: 2644,392 2708,579
  rectangle net VCC_3V3: 812,728 847,764
  rectangle net NetR36_1: 2828,632 2867,673
  rectangle net NetR29_1: 2021,702 2079,751
  rectangle net GND: 1651,697 1689,808
  rectangle net VCC_3V3: 1178,567 1353,644
  rectangle net VCC_3V3: 1178,472 1353,543
  rectangle net VCC_3V3: 812,757 1335,795
  rectangle net VCC_7V5: 1761,1485 1920,1516
  region net GND: 2805,674 2644,674 2644,549 2805,549
  rectangle net NetR30_1: 2641,706 2692,750
  rectangle net NetR21_1: 1399,700 1457,749
  rectangle net NetR22_1: 1471,692 1507,732
  rectangle net GND: 1420,760 1689,808
  rectangle net VCC_3V3: 1014,680 1335,766
  rectangle net NetR10_1: 858,702 917,747
  rectangle net VCC_3V3: 993,1664 1660,1708
  rectangle net VCC_3V3: 1608,1060 1668,1700
  region net GND: 1816,1662 1748,1662 1748,1525 1816,1525
  rectangle net VCC_7V5: 1831,1485 1956,1698
  rectangle net NetQ1_1: 1742,1438 1921,1476
  rectangle net OLED_IO: 1705,1525 1741,1856
  rectangle net GND: 1104,1121 1581,1642
  rectangle net VCC_3V3: 1053,1014 1668,1106
  rectangle net VCC_3V3: 993,1014 1081,1695

## Silkscreen, mask and mechanical layers (free items; w line width, h text height)
Top Overlay:
  lines w10: 1962,1279 1975,1279 1986,1290 1986,1329
  text "RESET" at 350,1827 h60
  text "&" at 93,1756 h60
  text "&" at 1958.23,1659.9 h60
  text "BOOT_0" at 135,1598 h60
  text "@" at 736,1386 h35
  text "@" at 786,1361 h35
  text "@" at 204,1359 h35
  text "@" at 843,1337 h35
  text "&" at 2104,1337 h60
  text "@" at 899,1310 h35
  text "&" at 1960,1209 h60
  text "BOOT_1" at 135,1206 h60
  text "USB" at 2441,1010 h60
  text "@" at 1268,994 h35
  text "&" at 2141,984 h60
  text "@" at 204,969 h35
  text "@" at 1243,938 h35
  text "@" at 2274,862.5 h35
  text "@" at 1659,861.5 h35
  text "@" at 425,859.5 h35
  text "@" at 1041,859.5 h35
  text "@" at 2896.65,855.93 h35
  text "@" at 1719,811.5 h35
  text "@" at 1824,811.5 h35
  text "@" at 2338,811.5 h35
  text "@" at 2444,810.5 h35
  text "@" at 484,808.5 h35
  text "@" at 589,808.5 h35
  text "@" at 1101,809.5 h35
  text "@" at 1206,808.5 h35
  text "@" at 2950.65,807.93 h35
  text "@" at 3057.65,807.93 h35
  text "&" at 865,805 h60
  text "&" at 1509,805 h60
  text "&" at 2107,805 h60
  text "&" at 2722,805 h60
  text "&" at 248,804 h60
  text "*" at 2521.65,772.93 h100
  text "*" at 49,771.5 h100
  text "*" at 671,771.5 h100
  text "*" at 1282,771.5 h100
  text "*" at 1900,771.5 h100
  text "*" at 89,734 h100
  text "*" at 710,734 h100
  text "*" at 1321,734 h100
  text "*" at 1939,734 h100
  text "*" at 2560.65,731.43 h100
  text "*" at 1743,684.5 h100
  text "*" at 2355,684.5 h100
  text "*" at 1818,682.5 h100
  text "*" at 2431,681 h100
  text "*" at 2975,681.5 h100
  text "*" at 503,678.5 h100
  text "*" at 3050.65,678.93 h100
  text "*" at 1119,677.5 h100
  text "*" at 1193,676 h100
  text "*" at 578,675.5 h100
  text "*" at 49,666.5 h100
  text "*" at 671,666.5 h100
  text "*" at 1900,667 h100
  text "*" at 2521.65,664.43 h100
  text "*" at 1282,663.5 h100
  text "*" at 1939,630.5 h100
  text "*" at 89,627.5 h100
  text "*" at 710,627.5 h100
  text "*" at 1321,627.5 h100
  text "*" at 2560.65,624.43 h100
  text "*" at 1780,614.5 h100
  text "*" at 2392,614 h100
  text "*" at 3011.65,611.43 h100
  text "*" at 539,609 h100
  text "*" at 1155,609.5 h100
  text "*" at 1818,576.5 h100
  text "*" at 2431,575.5 h100
  text "*" at 1193,574 h100
  text "*" at 3050.65,573.43 h100
  text "*" at 578,571.5 h100
  text "*" at 1900,565 h100
  text "*" at 2521.65,559.93 h100
  text "*" at 49,559 h100
  text "*" at 671,559 h100
  text "*" at 1282,557.5 h100
  text "*" at 1939,528 h100
  text "*" at 89,521.5 h100
  text "*" at 710,520.5 h100
  text "*" at 1321,521.5 h100
  text "*" at 2560.65,521.43 h100
  text "*" at 2392,510 h100
  text "*" at 1780,509 h100
  text "*" at 539,505 h100
  text "*" at 3011.65,505.43 h100
  text "*" at 1155,504 h100
  text "*" at 1818,471.5 h100
  text "*" at 2431,471.5 h100
  text "*" at 578,467.5 h100
  text "*" at 1193,467 h100
  text "*" at 3050.65,467.43 h100
  text "*" at 1900,462 h100
  text "*" at 49,454.5 h100
  text "*" at 2521.65,455.43 h100
  text "*" at 1282,451.5 h100
  text "*" at 671,448.5 h100
  text "*" at 1939,422.5 h100
  text "*" at 89,418 h100
  text "*" at 2560.65,415.93 h100
  text "*" at 1321,415 h100
  text "*" at 710,408.5 h100
  text "*" at 2392,406 h100
  text "*" at 539,402.5 h100
  text "*" at 1780,403.5 h100
  text "*" at 3011.65,399.93 h100
  text "*" at 1155,398.5 h100
  text "*" at 1818,366.5 h100
  text "*" at 2431,367 h100
  text "*" at 578,365 h100
  text "*" at 1193,365 h100
  text "*" at 3050.65,364.43 h100
  text "I2C_LINES" at 1000,226 h60
Bottom Overlay:
  text "@" at 1355,1777 h35
  text "@" at 1405,1777 h35
  text "@" at 1454,1777 h35
  text "@" at 1503,1777 h35
  text "@" at 1552,1777 h35
  text "@" at 1601,1777 h35
  text "&" at 1139,1705 h60
  text "&" at 1683,1603 h60
  text "Note:" at 284.46,1563.46 h80
  text "*" at 1812,1535 h100
  text "* >> 47K" at 285,1500 h80
  text "*" at 1867,1481 h100
  text "&" at 1039,1463 h60
  text "@ >> 10K" at 285,1421.92 h80
  text "@" at 1746,1412 h35
  text "&" at 1039,1393 h60
  text "& >> 0.1uF" at 280.17,1364 h80
  text "@" at 1746,1363 h35
  text "@" at 1746,1313 h35
  text "&" at 1039,1234 h60
  text "&" at 1078,1132 h60
  text "@" at 966,1102 h35
  text "&" at 1141,1015 h60
  text "&" at 1576,1015 h60
  text "@" at 2076,825.5 h35
  text "@" at 278,822.5 h35
  text "@" at 1453,823.5 h35
  text "@" at 2689,812 h35
  text "@" at 1503,807 h35
  text "@" at 890,805.5 h35
  text "@" at 2126,796.5 h35
  text "@" at 224,794.5 h35
  text "@" at 837,777.5 h35
  text "@" at 2302,746.5 h35
  text "@" at 398,746 h35
  text "@" at 1047,745.5 h35
  text "@" at 1685,745.5 h35
  text "@" at 2739,737 h35
  text "@" at 2898,644 h35
Mechanical 2:
  the board outline again, w10

## Dimensions
0,1817 to 0,0 on Mechanical 1
-87,-87 to 3215,-87 on Mechanical 1
-87,1904 to -96,-88 on Mechanical 1

## Text inside footprints (layer, text, board x,y; h text height)
J1: Top Overlay "Board Edge" at 3090.88,1071.63 h39.37 r90